# Altium PCB PCB_New-Project_2026-10-14.pcbdoc
Units mil, origin at the board's own origin, x right, y up, seen from the top; angles counter-clockwise.
Board outline 3038.68 x 3315.27 mil, 2 copper layers (Top Layer, Bottom Layer); 55 components, 36 nets, 173 pads, 105 vias.
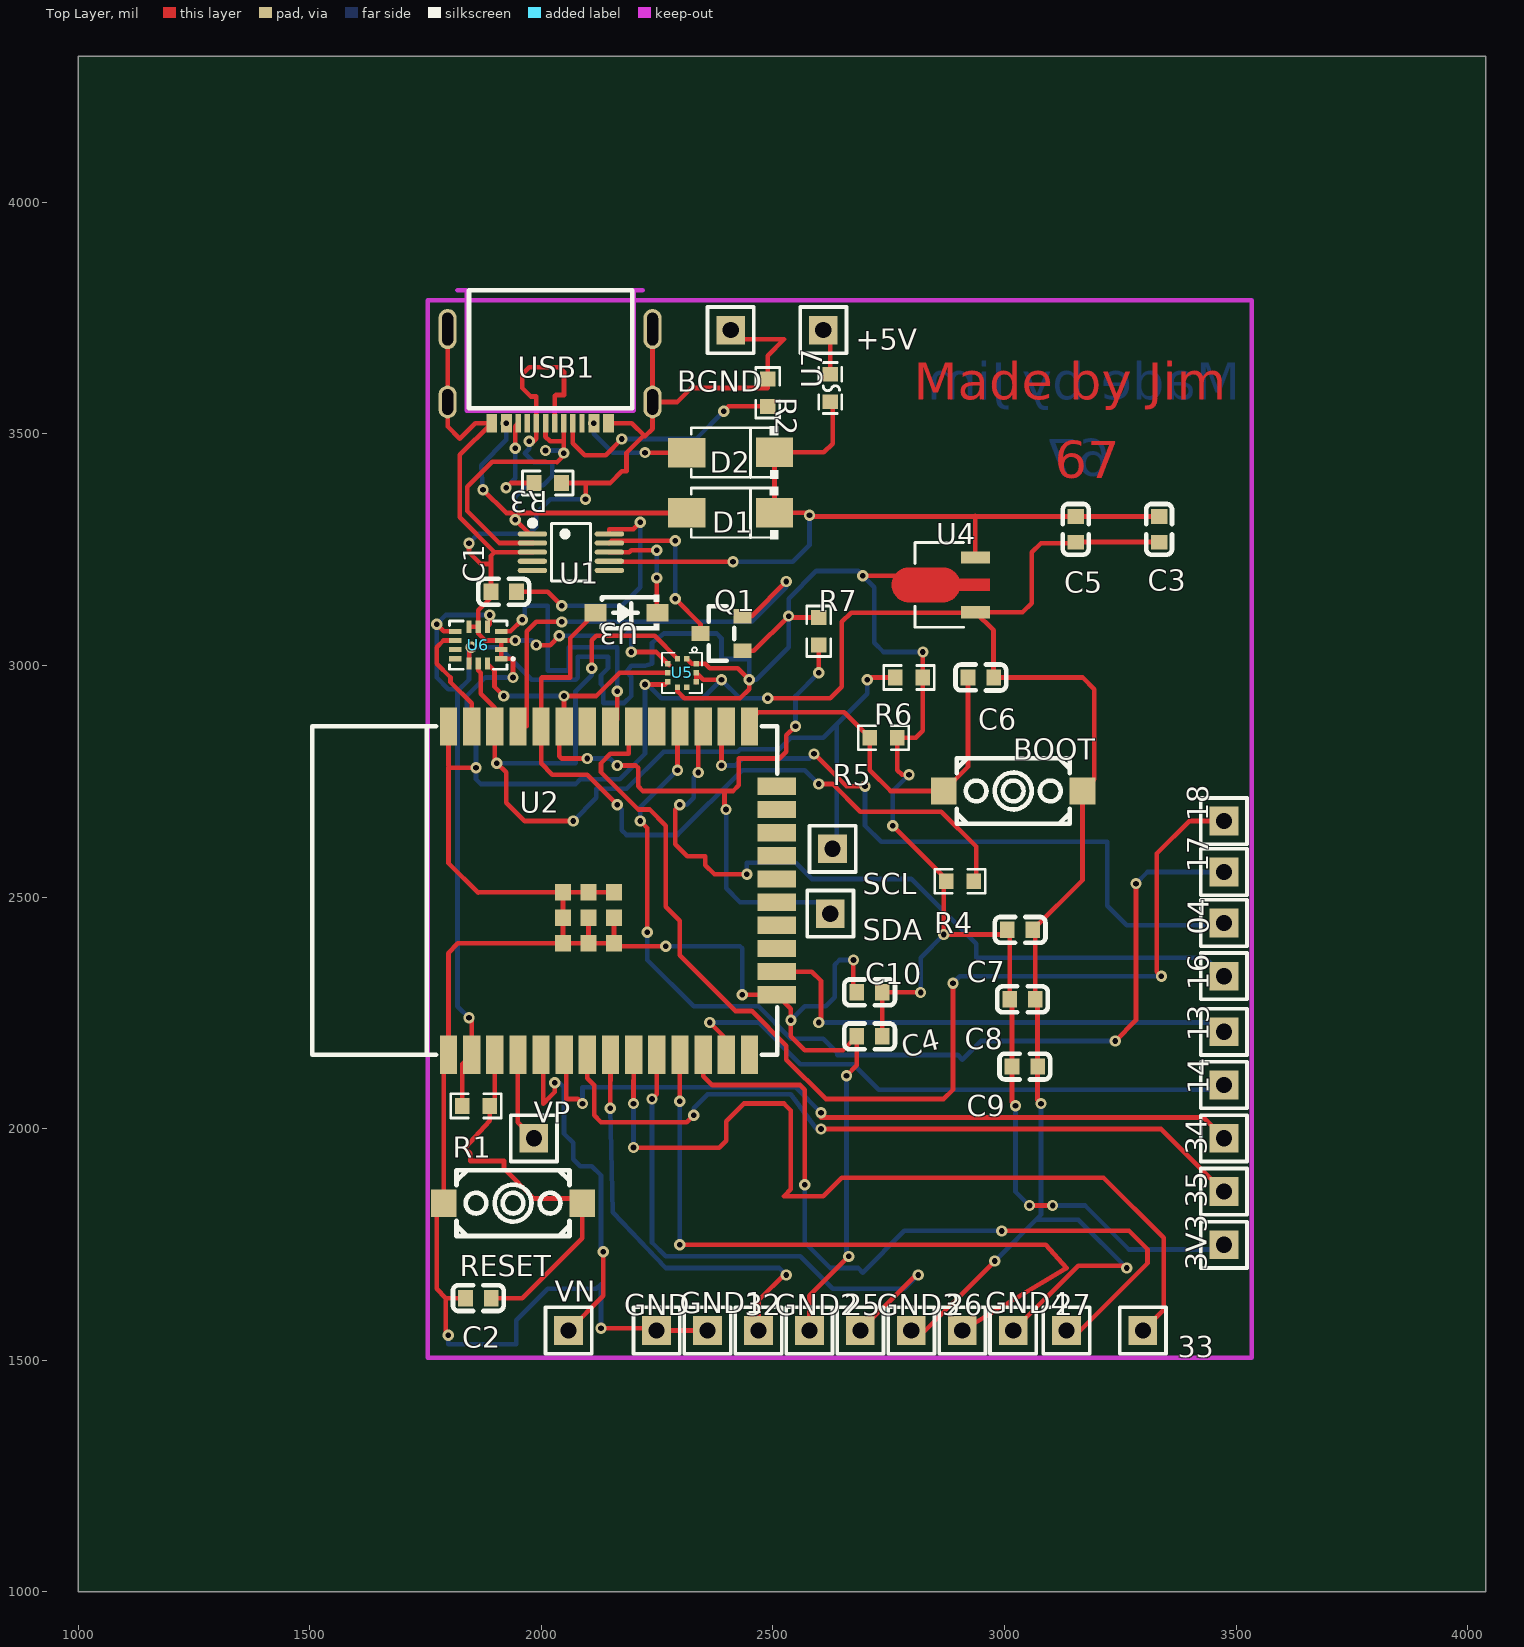
[diagram p0: Top Layer view]
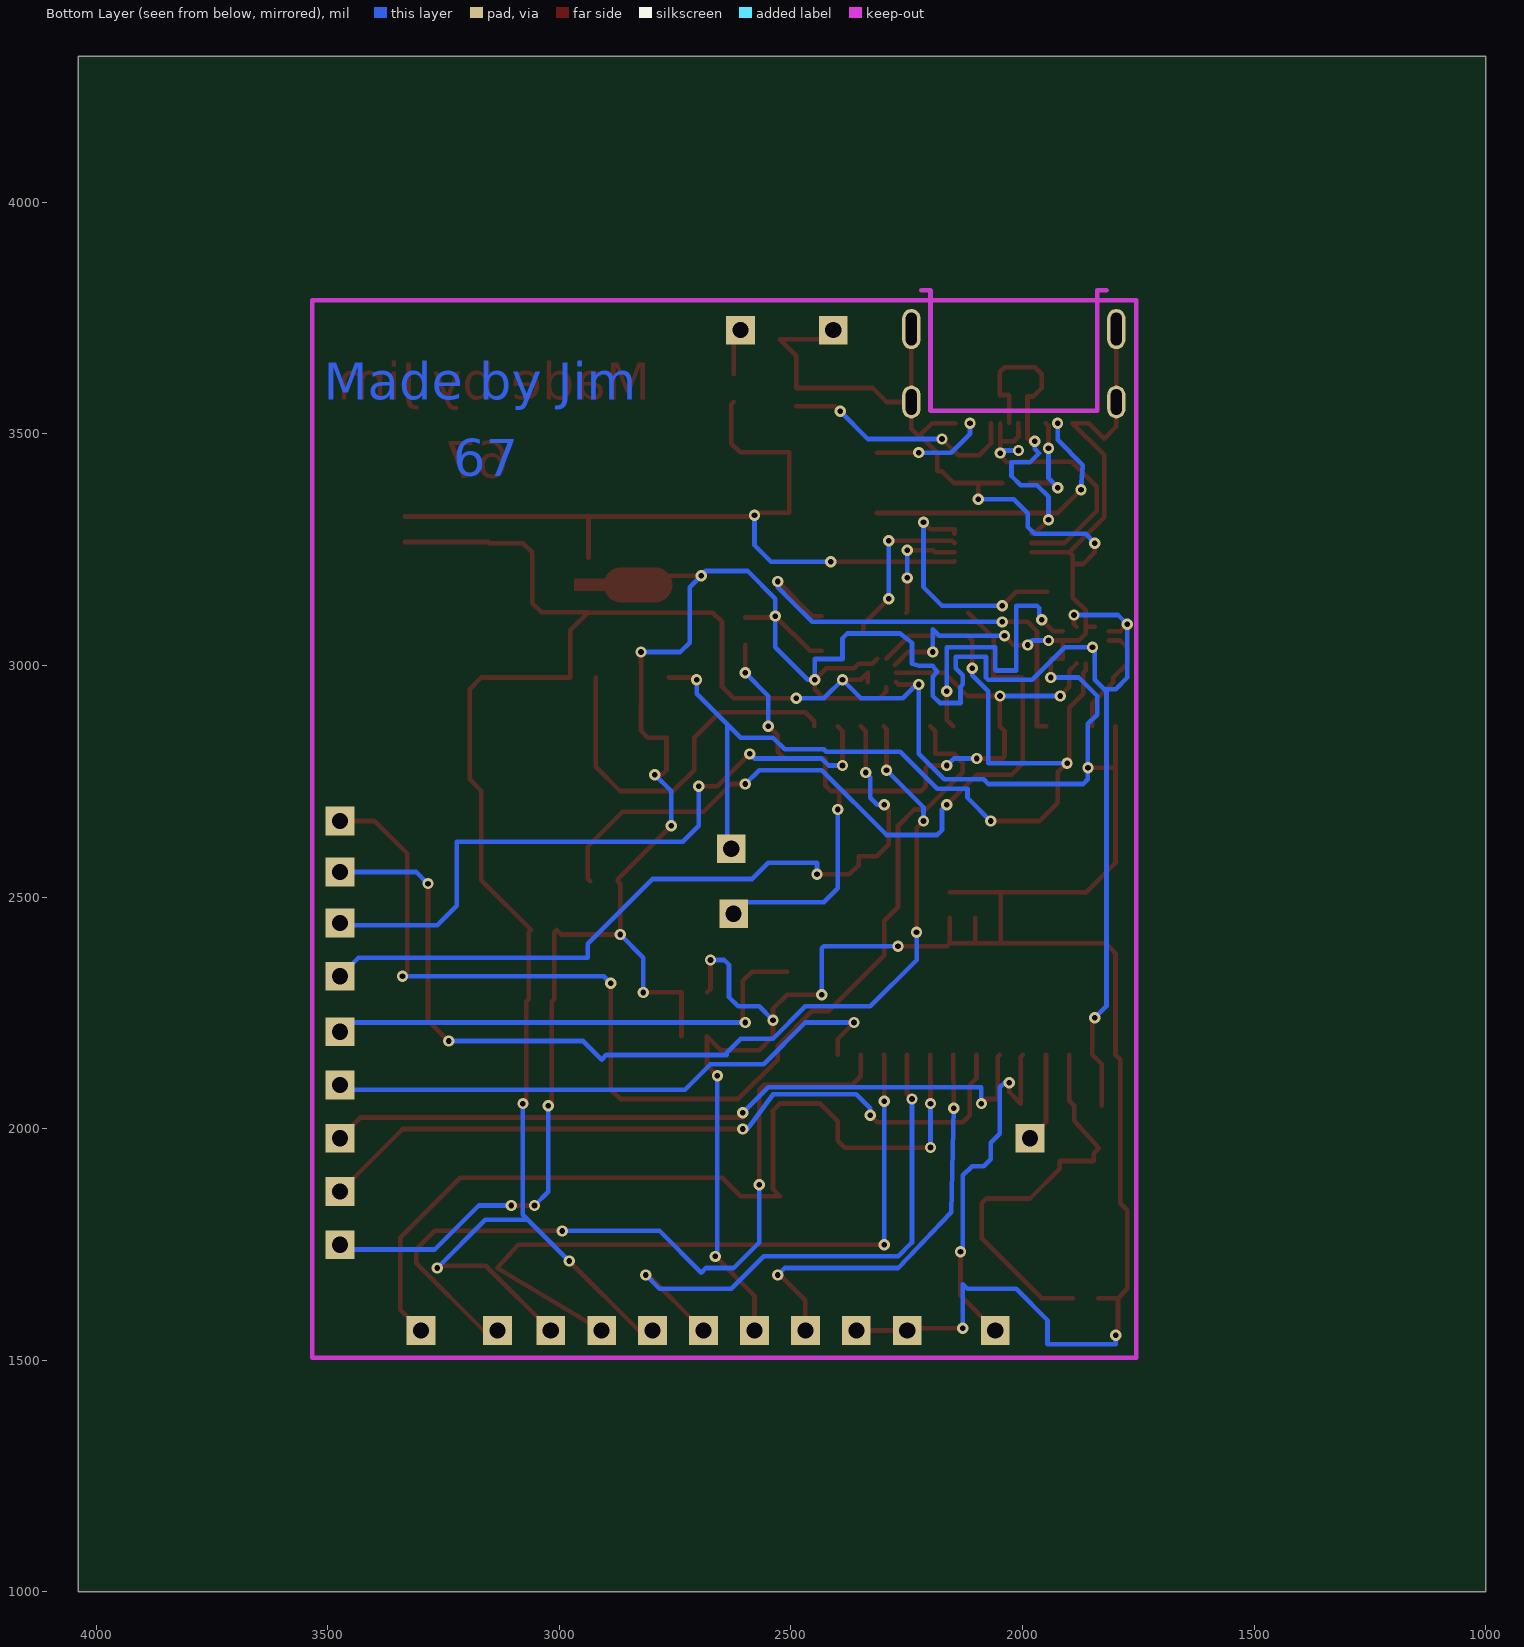
[diagram p1: Bottom Layer view, seen from below]

## Layer stack, top to bottom
Top Layer: signal copper (thickness not stored)
Dielectric: dielectric 12.6, FR-4, Dk 4.8
Bottom Layer: signal copper (thickness not stored)

## Board outline
4038.68,1000 1000,1000 1000,4315.27 4038.68,4315.27

## Components (designator, comment, footprint, x,y, rotation, side; value= is the part's Value field where it differs from the comment)
3V3 "1" HDR-M-2.54_1X1 3473.68,1748.97 r90 top
04 "1" HDR-M-2.54_1X1 3473.68,2443.97 r90 top
13 "1" HDR-M-2.54_1X1 3473.68,2208.97 r90 top
14 "1" HDR-M-2.54_1X1 3473.68,2093.97 r90 top
16 "1" HDR-M-2.54_1X1 3473.68,2328.97 r90 top
17 "1" HDR-M-2.54_1X1 3473.68,2553.97 r90 top
18 "1" HDR-M-2.54_1X1 3473.68,2663.97 r90 top
25 "1" HDR-M-2.54_1X1 2688.68,1563.97 r0 top
26 "1" HDR-M-2.54_1X1 2908.68,1563.97 r0 top
27 "1" HDR-M-2.54_1X1 3133.68,1563.97 r0 top
32 "1" HDR-M-2.54_1X1 2468.68,1563.97 r0 top
33 "1" HDR-M-2.54_1X1 3298.68,1563.97 r0 top
34 "1" HDR-M-2.54_1X1 3473.68,1978.97 r90 top
35 "1" HDR-M-2.54_1X1 3473.68,1863.97 r90 top
+5V "1" HDR-M-2.54_1X1 2608.68,3723.97 r0 top
BGND "1" HDR-M-2.54_1X1 2408.68,3723.97 r0 top
BOOT "K2-3.6×6.1_SMD" KEY-SMD_2P-L6.2-W3.6-LS8.0 3018.68,2728.97 r0 top
C1 "1.0u" C0603 1918.68,3158.97 r0 top
C2 "1.0u" C0603 1863.68,1633.97 r0 top
C3 "0.1u" C0603 3333.68,3293.97 r270 top
C4 "22u" C0603 2708.68,2198.97 r0 top
C5 "10.0u" C0603 3153.68,3293.97 r270 top
C6 "0.1u" C0603 2948.68,2973.97 r180 top
C7 "0.1u" C0603 3033.68,2428.97 r180 top
C8 "0.1u" C0603 3038.68,2278.97 r180 top
C9 "0.1u" C0603 3043.68,2133.97 r180 top
C10 "0.1u" C0603 2708.68,2293.97 r0 top
D1 "SS14_C55127344" SMA_L4.3-W2.6-LS5.0-RD 2408.68,3329.6 r180 top
D2 "SS14_C55127344" SMA_L4.3-W2.6-LS5.0-RD 2408.68,3459.6 r180 top
GND "1" HDR-M-2.54_1X1 2248.68,1563.97 r0 top
GND1 "1" HDR-M-2.54_1X1 2358.68,1563.97 r0 top
GND2 "1" HDR-M-2.54_1X1 2578.68,1563.97 r0 top
GND3 "1" HDR-M-2.54_1X1 2798.68,1563.97 r0 top
GND4 "1" HDR-M-2.54_1X1 3018.68,1563.97 r0 top
Q1 "2N7002" SOT-23_L2.9-W1.3-P0.95-LS2.4-BR 2388.68,3068.97 r0 top
R1 "10k" R0603 1858.68,2048.97 r0 top
R2 "5.1k" R0603 2488.68,3588.97 r270 top
R3 "5.1k" R0603 2013.68,3393.97 r180 top
R4 "4.7k" R0603 2903.68,2533.97 r0 top
R5 "4.7k" R0603 2738.68,2843.97 r180 top
R6 "4.7k" R0603 2793.68,2973.97 r180 top
R7 "4.7k" R0603 2598.68,3073.97 r90 top
RESET "K2-3.6×6.1_SMD" KEY-SMD_2P-L6.2-W3.6-LS8.0 1938.68,1838.97 r0 top
SCL "1" HDR-M-2.54_1X1 2628.68,2603.97 r0 top
SDA "1" HDR-M-2.54_1X1 2623.68,2463.97 r0 top
U1 "CH340E" MSOP-10_L3.0-W3.0-P0.50-LS5.0-BL 2063.68,3244.6 r270 top
U2 "ESP32-WROOM-32E-H4" WIFI-SMD_ESP32-WROOM-32E 2153.68,2513.97 r0 top
U3 "B0520W" SOD-123_L2.7-W1.6-LS3.7-RD-1 2183.68,3113.97 r180 top
U4 "AMS1117-3.3" SOT-89-3_L4.5-W2.5-P1.50-LS4.2-BR 2883.68,3173.97 r0 top
U5 "BMP388(TOKMAS)" LGA-10_L2.0-W2.0-P0.50-BL 2303.68,2983.97 r180 top
U6 "LSM6DS3TR-C" LGA-14_L3.0-W2.5-P0.50-TL 1863.68,3043.97 r180 top
U7 "0603L075/12AR" F0603 2623.68,3598.97 r90 top
USB1 "USBC1-AF-046" USB-C-SMD_USBC1-AF-046 2018.68,3624.6 r180 top
VN "1" HDR-M-2.54_1X1 2058.68,1563.97 r270 top
VP "1" HDR-M-2.54_1X1 1983.68,1978.97 r0 top

## Footprints (in the part's own frame and the unit in brackets; to place one, negate y for a bottom-side part, rotate by r counter-clockwise, add the part's x,y. Pads: shape width x height; smd on the part's side, far side on the other; paste and mask are expansions set on the pad)
C0603 [mm]
  rect 0.8x0.9 smd paste+0 mask+0.051: 1(-0.7,0) 2(0.7,0)
  silkscreen extent -1.39,-0.71 1.39,0.71
F0603 [mil]
  rect 31.75x34.02 smd paste-3937.01 mask+2: 1(-29.65,0) 2(29.66,0)
  silkscreen extent -55,-25 55,25
HDR-M-2.54_1X1 [mil]
  rect 62x62 hole 35 paste+0 mask+2: 1(0,0)
  silkscreen extent -50,-50 50,50
KEY-SMD_2P-L6.2-W3.6-LS8.0 [mm]
  rect 1.4x1.5 smd paste+0 mask+0.051: 1(-3.8,0) 2(3.8,0)
  silkscreen extent -3.1,-1.8 3.1,1.8
LGA-10_L2.0-W2.0-P0.50-BL [mm]
  rect 0.3x0.3 smd paste+0 mask+0.05: 1(-0.25,-0.78) 2(0.25,-0.78) 3(0.78,-0.5) 4(0.78,0) 5(0.78,0.5) 6(0.25,0.78) 7(-0.25,0.78) 8(-0.78,0.5) 9(-0.78,0) 10(-0.78,-0.5)
  silkscreen extent -1.1,-1.4 1.1,1.1
LGA-14_L3.0-W2.5-P0.50-TL [mm]
  rect 0.675x0.28 smd paste+0 mask+0.051: 1(-1.262,0.75) 2(-1.262,0.25) 3(-1.262,-0.25) 4(-1.262,-0.75) 8(1.262,-0.75) 9(1.262,-0.25) 10(1.262,0.25) 11(1.262,0.75)
  rect 0.28x0.675 smd paste+0 mask+0.051: 5(-0.5,-1.012) 6(0,-1.012) 7(0.5,-1.012) 12(0.5,1.012) 13(0,1.012) 14(-0.5,1.012)
  silkscreen extent -1.98,-1.33 1.58,1.33
MSOP-10_L3.0-W3.0-P0.50-LS5.0-BL [mm]
  oval 0.28x1.62 smd paste+0 mask+0.051: 1(-1,-2.11) 2(-0.5,-2.11) 3(0,-2.11) 4(0.5,-2.11) 5(1,-2.11) 6(1,2.11) 7(0.5,2.11) 8(0,2.11) 9(-0.5,2.11) 10(-1,2.11)
  silkscreen extent -1.74,-2.26 1.58,1.07
R0603 [mil]
  rect 31.75x34.02 smd paste-3937.01 mask+2: 1(-29.65,0) 2(29.65,0)
  silkscreen extent -55,-26 55,26
SMA_L4.3-W2.6-LS5.0-RD [mm]
  rect 2.046x1.62 smd paste+0 mask+0.051: 1(-2.404,-0.009) 2(2.404,0.009)
  silkscreen extent -2.61,-1.44 2.16,1.44
SOD-123_L2.7-W1.6-LS3.7-RD-1 [mm]
  rect 1.2x0.95 smd paste+0 mask+0.051: 1(-1.7,0) 2(1.7,0)
  silkscreen extent -1.81,-0.98 1.35,0.98
SOT-23_L2.9-W1.3-P0.95-LS2.4-BR [mm]
  rect 1x0.8 smd paste+0 mask+0.051: 1(1.15,-0.95) 2(1.15,0.95) 3(-1.15,0)
  silkscreen extent -0.7,-1.5 0.7,1.5
SOT-89-3_L4.5-W2.5-P1.50-LS4.2-BR [mm]
  rect 1.575x0.672 smd paste+0 mask+0.051: 1(1.356,-1.5) 3(1.356,1.5)
  Top Layer region: -2.283,0.95 -0.429,0.95 -0.384,0.949 -0.34,0.946 -0.296,0.94 -0.252,0.933 -0.208,0.924 -0.165,0.912 -0.123,0.899 -0.081,0.884 -0.04,0.866 0,0.847 0.04,0.826 0.078,0.803 0.115,0.779 0.151,0.752 0.185,0.724 0.219,0.695 0.251,0.664 0.281,0.631 0.31,0.597 0.337,0.562 0.362,0.525 0.386,0.488 0.408,0.449 0.428,0.409 0.447,0.33 2.144,0.33 2.144,-0.33 0.447,-0.33 0.428,-0.409 0.408,-0.449 0.386,-0.488 0.362,-0.526 0.337,-0.562 0.31,-0.597 0.281,-0.631 0.251,-0.664 0.219,-0.695 0.185,-0.725 0.151,-0.753 0.115,-0.779 0.078,-0.804 0.04,-0.827 0,-0.848 -0.04,-0.867 -0.081,-0.884 -0.123,-0.899 -0.165,-0.913 -0.208,-0.924 -0.252,-0.934 -0.296,-0.941 -0.34,-0.946 -0.384,-0.949 -0.429,-0.95 -2.283,-0.95 -2.328,-0.949 -2.372,-0.946 -2.416,-0.941 -2.46,-0.934 -2.504,-0.924 -2.547,-0.913 -2.589,-0.899 -2.631,-0.884 -2.672,-0.867 -2.713,-0.848 -2.752,-0.827 -2.79,-0.804 -2.827,-0.779 -2.863,-0.753 -2.898,-0.725 -2.931,-0.695 -2.963,-0.664 -2.993,-0.631 -3.022,-0.597 -3.049,-0.562 -3.075,-0.526 -3.098,-0.488 -3.12,-0.449 -3.141,-0.409 -3.159,-0.369 -3.175,-0.327 -3.189,-0.285 -3.202,-0.242 -3.212,-0.199 -3.22,-0.155 -3.227,-0.111 -3.231,-0.067 -3.233,-0.022 -3.233,0.022 -3.231,0.067 -3.227,0.111 -3.22,0.155 -3.212,0.199 -3.202,0.242 -3.189,0.285 -3.175,0.327 -3.159,0.369 -3.141,0.409 -3.12,0.449 -3.098,0.488 -3.075,0.525 -3.049,0.562 -3.022,0.597 -2.993,0.631 -2.963,0.664 -2.931,0.695 -2.898,0.724 -2.863,0.752 -2.827,0.779 -2.79,0.803 -2.752,0.826 -2.713,0.847 -2.672,0.866 -2.631,0.884 -2.589,0.899 -2.547,0.912 -2.504,0.924 -2.46,0.933 -2.416,0.94 -2.372,0.946 -2.328,0.949
  silkscreen extent -1.95,-2.33 0.7,2.33
USB-C-SMD_USBC1-AF-046 [mm]
  rect 0.6x1 smd paste-100 mask+0.05: A1B12(-3.2,2.583) A4B9(-2.4,2.583) B1A12(3.2,2.583) B4A9(2.4,2.583)
  rect 0.3x1 smd paste-100 mask+0.05: A5(-1.25,2.583) A6(-0.25,2.583) A7(0.25,2.583) A8(-1.75,2.583) B5(1.75,2.583) B6(0.75,2.583) B7(-0.75,2.583) B8(1.25,2.583)
  oval 1x2.2 hole 0.6 slot 1.8 at 90 deg paste+0 mask+0.05: EP(-5.62,-2.583) EP(5.62,-2.583)
  oval 1x1.8 hole 0.6 slot 1.4 at 90 deg paste+0 mask+0.05: EP(-5.62,1.417) EP(5.62,1.417)
  Keep-Out Layer lines w0.254: 5.08,-4.716 4.572,-4.716 4.572,1.888 -4.572,1.888 -4.572,-4.716 -5.08,-4.716
  silkscreen extent -4.5,-4.71 4.44,1.76
WIFI-SMD_ESP32-WROOM-32E [mm]
  rect 0.95x2.1 smd paste+0 mask+0.051: 1(-9.002,-9) 2(-7.732,-9) 3(-6.462,-9) 4(-5.192,-9) 5(-3.922,-9) 6(-2.652,-9) 7(-1.382,-9) 8(-0.112,-9) 9(1.158,-9) 10(2.428,-9) 11(3.698,-9) 12(4.968,-9) 13(6.238,-9) 14(7.508,-9) 25(7.507,9) 26(6.237,9) 27(4.967,9) 28(3.697,9) 29(2.427,9) 30(1.157,9) 31(-0.113,9) 32(-1.383,9) 33(-2.653,9) 34(-3.923,9) 35(-5.193,9) 36(-6.463,9) 37(-7.733,9) 38(-9.003,9)
  rect 2.1x0.95 smd paste+0 mask+0.051: 15(9.002,-5.715) 16(9.002,-4.445) 17(9.002,-3.175) 18(9.002,-1.905) 19(9.002,-0.635) 20(9.002,0.635) 21(9.002,1.905) 22(9.002,3.175) 23(9.002,4.445) 24(9.002,5.715)
  rect 0.9x0.9 smd paste+0 mask+0.051: 39(-2.721,-2.9) 39(-2.721,-1.5) 39(-2.721,-0.1) 39(-1.322,-2.9) 39(-1.322,-0.1) 39(-1.321,-1.5) 39(0.079,-2.9) 39(0.079,-1.5) 39(0.079,-0.1)
  silkscreen extent -16.48,-9 9.02,9.02

## Via types
v1: diameter 24.41, hole 12.2, Top Layer to Bottom Layer, tented both sides, 105 vias

## Nets (pads, with @x,y where several pads share a name; then routed paths per layer and width w, separated by ;. In a path a pad name is that pad's centre, name@x,y a point inside that pad or via, vN(x,y) a via of type N, cw(c..) or ccw(c..) an arc to the next point about the centre after c; other vN are vias at no path point)
+3.3V: 3V3.1 C4.2 C7.2 C8.2 C9.2 C10.2 Q1.1 R1.1 R4.1 R5.1 R6.1 R7.2 U2.2 U5.1 U5.6 U5.10 U6.5 U6.8 U6.12 | length 6107.9
  Top Layer w10: v1(1773.68,3088.97) 1789.15,3073.5 U6.8 ; R1.1 1829.02,2139.41 U2.2 1849.25,2233.4 v1(1843.68,2238.97) ; U6.12 1843.99,3034.28 v1(1848.68,3038.97) ; U6.5 1888.68,3089.15 v1(1888.68,3108.97) ; U5.6 2293.84,2943.81 2308.68,2928.97 2428.68,2928.97 2448.68,2948.97 v1(2448.68,2968.97) 2423.68,2993.97 2363.68,2993.97 2353.99,3003.66 U5.10 2324.54,3003.66 U5.1 ; Q1.1 2458.68,3031.57 v1(2533.68,3106.57) 2536.62,3103.63 R7.2 ; v1(2693.68,3193.97) 2810.29,3193.97 2830.29,3173.97 ; C4.2 C10.2 v1(2818.68,2293.97) ; v1(2758.68,2653.97) 2874.03,2538.62 R4.1 2868.68,2528.62 v1(2868.68,2418.97) 2996.12,2418.97 C7.2 3011.12,2423.97 C8.2 3016.12,2273.97 C9.2 3016.12,2056.53 v1(3023.68,2048.97) ; R5.1 2768.68,2843.62 2768.68,2773.97 2778.68,2763.97 v1(2793.68,2763.97) ; R5.1@2768.38,2844 2808.68,2844 2823.68,2859 2823.38,2974 v1(2823.68,3028.97) ; v1(3053.68,1833.97) v1(3103.68,1833.97)
  Bottom Layer w10: 1823.62,2948.91 1798.74,2948.91 1773.68,2973.97 v1(1773.68,3088.97) 1793.68,3108.97 v1(1888.68,3108.97) ; v1(1843.68,2238.97) 1818.68,2264 1818.68,2944 1843.68,2969 1843.68,3033.97 v1(1848.68,3038.97) ; v1(1848.68,3038.97) 1908.68,3039 1978.68,2969 2074.48,2969 2078.68,2973.2 2078.68,3019 2143.68,3019 2143.68,2994 2128.68,2979 2128.68,2959 2133.68,2954 2133.68,2919 2178.68,2919 2193.68,2934 2193.68,2976 2183.68,2986 2193.68,2999 2213.68,2999 2223.68,2998.97 2238.68,3004 2238.68,3049 2264.28,3069 2378.68,3069 2388.68,3059 2388.68,3014 2448.68,3014 v1(2448.68,2968.97) ; v1(2448.68,2968.97) 2463.68,2968.97 2533.68,3038.97 v1(2533.68,3106.57) ; v1(2533.68,3106.57) 2533.68,3144 2593.68,3204 2683.68,3204 v1(2693.68,3193.97) ; v1(2693.68,3193.97) 2718.68,3168.97 2718.68,3048.97 2738.68,3028.97 v1(2823.68,3028.97) ; v1(2758.68,2653.97) 2758.68,2728.97 v1(2793.68,2763.97) ; v1(2818.68,2293.97) 2818.68,2368.97 v1(2868.68,2418.97) ; v1(3023.68,2048.97) 3023.68,1863.97 v1(3053.68,1833.97) ; v1(3103.68,1833.97) 3173.68,1833.97 3268.68,1738.97 3463.68,1738.97 3V3.1
+5V_1: +5V.1 U7.2 | length 101.6
  Top Layer w10: +5V.1 2623.68,3708.97 U7.2
GND: BGND.1 BOOT.2 C1.1 C2.1 C3.2 C4.1 C5.2 C6.1 C7.1 C8.1 C9.1 C10.1 GND1.1 GND2.1 GND3.1 GND4.1 GND.1 R2.1 R3.1 RESET.1 U1.3 U2.1 U2.15 U2.38 U2.39 U4.1 U5.3 U5.5 U5.8 U5.9 U6.1 U6.2 U6.3 U6.6 U6.7 USB1.A1B12 USB1.B1A12 USB1.EP | length 12724.6
  Top Layer w10: 1793.68,1634 1793.68,1558.97 v1(1798.68,1553.97) ; USB1.EP@1797.42,3726.28 1797.42,3568.8 1797.42,3515.86 1823.68,3489.6 1856.99,3522.91 USB1.B1A12 1823.68,3454.6 1823.68,3319.6 1898.68,3244.6 ; U2.1 1789.08,2149.47 RESET.1 1773.68,1823.57 1773.68,1653.96 1793.66,1634 C2.1 ; 1799.25,2783.09 U2.38@1799.25,2868.3 ; U2.1 1799.28,2378.4 1819.48,2399.8 U2.39@2046.48,2399.8 ; v1(1843.68,3263.97) 1843.68,3243.97 1868.68,3218.97 1891.12,3218.97 ; U6.7 U6.6 ; v1(1858.68,2778.97) 1799.25,2778.97 1799.25,2573.4 1863.68,2508.97 1864.75,2510.03 U2.39@2046.53,2510.03 ; v1(1938.68,2973.97) 1938.68,3014.44 U6.1 U6.2 U6.3 ; v1(1943.68,3053.97) 1913.53,3053.97 U6.3 ; U1.3 1898.68,3244.6 ; v1(1988.68,3043.97) 2018.68,3043.97 v1(2038.68,3063.97) ; R3.1 2148.68,3393.97 2173.68,3418.97 2183.68,3418.97 2183.68,3458.97 2219.31,3494.6 2223.68,3494.6 ; v1(2095.32,3358.97) 2095.33,3393.97 ; U2.39@2101.65,2454.91 U2.39@2101.65,2399.8 ; v1(2128.68,1568.97) 2243.68,1568.97 GND.1 GND1.1 ; USB1.A1B12 2195.38,3522.91 2223.68,3494.6 ; U2.39@2156.77,2454.91 U2.39@2156.77,2399.8 ; U2.39@2156.77,2510.03 2101.65,2510.03 U2.39@2046.53,2510.03 ; v1(2193.68,3028.97) 2247.66,3028.97 U5.3 ; v1(2223.68,2958.97) 2267.65,2958.97 U5.5 ; USB1.EP@2239.94,3726.3 2239.94,3568.8 2239.94,3510.86 2223.68,3494.6 ; USB1.EP@2239.98,3568.8 2293.48,3568.8 2323.68,3599 2488.68,3599 R2.1 ; v1(2268.68,2393.97) 2162.6,2393.97 U2.39@2156.77,2399.8 ; U5.3 U5.3@2275.68,3001 ; U5.8 U5.9 2349.39,2968.97 v1(2388.68,2968.97) ; BGND.1 2428.68,3703.97 2523.68,3703.97 2488.68,3668.97 R2.1 ; v1(2433.68,2288.97) U2.15 2538.68,2258.4 v1(2538.68,2233.97) 2538.68,2198.97 2568.68,2168.97 2651.12,2168.97 C4.1 2681.12,2136.41 v1(2658.68,2113.97) ; v1(2488.68,2928.97) 2623.68,2928.97 2648.68,2953.97 2648.68,3093.97 2668.68,3113.97 2936.14,3113.97 U4.1 ; GND2.1 2578.68,1638.97 v1(2663.68,1723.97) ; v1(2673.68,2363.97) 2673.68,2301.41 C10.1 ; GND3.1 2828.68,1563.97 v1(2978.68,1713.97) ; GND4.1 3158.71,1704 v1@3263.68,1704 ; v1(3078.68,2053.97) 3071.24,2061.41 C9.1 3071.24,2273.97 C8.1 3066.24,2423.97 C7.1 3168.29,2536.01 BOOT.2 3193.68,2754.36 3193.68,2948.97 3168.68,2973.97 C6.1 2976.24,3075.75 U4.1 ; C3.2 C5.2 3151.28,3264 3078.68,3264 3058.68,3244 3058.68,3134 3038.68,3114.9 U4.1 ; U6.6 1863.68,3118.97 1891.12,3146.41 C1.1 1891.12,3237.04 1898.68,3244.6 ; U6.6 1863.68,3068.97 1878.84,3053.81 U6.3 ; U2.39@2046.53,2510.03 2046.53,2454.91 2046.53,2399.8 U2.39@2101.65,2399.8 ; U2.39@2101.65,2399.8 U2.39@2156.77,2399.8
  Bottom Layer w10: v1(1798.68,1553.97) 1798.68,1534 1945.98,1534 1945.98,1586.3 2013.68,1654 2118.68,1654 2128.68,1664 v1(2128.68,1568.97) ; v1(1843.68,3263.97) 1863.68,3283.97 1893.68,3283.97 1973.68,3283.97 1988.68,3298.97 1988.68,3328.97 2018.68,3358.97 v1(2095.32,3358.97) ; v1(1938.68,2973.97) 1878.68,2973.97 1838.68,2933.97 1838.68,2893.97 1858.68,2873.97 v1(1858.68,2778.97) 1858.68,2753.97 1868.68,2743.97 2073.68,2743.97 2083.68,2753.97 2168.68,2753.97 2223.68,2808.97 v1(2223.68,2958.97) 2228.68,2958.97 2258.68,2928.97 2348.68,2928.97 v1(2388.68,2968.97) 2428.68,2928.97 v1(2488.68,2928.97) ; v1(1943.68,3053.97) 1978.68,3053.97 v1(1988.68,3043.97) ; v1(2038.68,3063.97) 2179.78,3063.97 2193.68,3077.87 ; v1(2268.68,2393.97) 2428.68,2393.97 2433.68,2388.97 v1(2433.68,2288.97) ; v1(2538.68,2233.97) 2568.68,2263.97 2613.68,2263.97 2633.68,2283.97 2633.68,2353.97 2643.68,2363.97 v1(2673.68,2363.97) ; v1(2658.68,2113.97) 2658.68,1728.97 v1(2663.68,1723.97) ; v1(2978.68,1713.97) 3078.68,1813.97 v1(3078.68,2053.97) ; 3067.84,1803.12 3159.53,1803.12 v1(3263.68,1698.97) ; 2193.68,3077.87 v1(2193.68,3028.97) 2193.68,3077.87
U1_8: U1.8 U3.1 | length 239.5
  Top Layer w10: U1.8 2189.31,3244.6 2193.68,3248.97 v1(2248.68,3248.97) ; v1(2248.68,3188.97) 2248.68,3115.9 U3.1
  Bottom Layer w10: v1(2248.68,3188.97) v1(2248.68,3248.97)
U1_9: Q1.3 U1.9 | length 366.5
  Top Layer w10: U1.9 2151.44,3268.97 v1(2288.68,3268.97) ; v1(2288.68,3143.97) 2343.41,3089.24 Q1.3
  Bottom Layer w10: v1(2288.68,3143.97) v1(2288.68,3268.97)
U1_10: C1.2 U1.10 | length 519.5
  Top Layer w10: C1.2 2013.68,3158.97 v1(2043.68,3128.97) ; U1.10 2146.78,3294 2198.68,3294 v1(2213.68,3308.97)
  Bottom Layer w10: v1(2043.68,3128.97) 2173.68,3128.97 2213.68,3168.97 v1(2213.68,3308.97)
U2_3: C2.2 R1.2 RESET.2 U2.3 | length 875.1
  Top Layer w10: R1.2 1899.25,2059.88 U2.3 ; R1.2@1888.38,2049 1888.38,2016.6 1834.98,1957.89 1846.4,1946.47 1846.4,1929.9 1919.32,1929.9 1919.32,1913.33 1983.68,1848.97 2078.29,1848.97 RESET.2 ; C2.2 1958.83,1633.97 2088.29,1763.44 RESET.2
U2_4: U2.4 VP.1 | length 194.9
  Top Layer w10: U2.4 1949.25,2013.4 VP.1
U2_5: U2.5 VN.1 | length 792.9
  Top Layer w10: U2.5 2003.68,2155.21 2003.68,2053.97 2028.68,2078.97 v1(2028.68,2098.97) ; VN.1 2133.68,1638.97 v1(2133.68,1733.97)
  Bottom Layer w10: v1(2028.68,2098.97) 2038.68,2099 2048.68,2089 2048.68,1989 2068.68,1969 2068.68,1934 2083.68,1919 2108.68,1919 2128.68,1899 2128.68,1739 v1(2133.68,1733.97)
U2_6: 34.1 U2.6 | length 2145.9
  Top Layer w10: U2.6 2053.68,2155.21 2053.68,2063.97 2078.68,2063.97 v1(2088.68,2053.97) ; v1(2603.68,2033.97) 2603.68,2024 3428.68,2024 34.1
  Bottom Layer w10: v1(2088.68,2053.97) 2088.68,2088.97 ; 2088.68,2088.97 2548.68,2088.97 ; 2088.68,2088.97 2548.68,2088.97 ; 2548.68,2088.97 v1(2603.68,2033.97) 2548.68,2088.97
U2_7: 35.1 U2.7 | length 1630.4
  Top Layer w10: U2.7 2099.25,2108.4 2113.68,2093.97 2113.68,2028.97 2128.68,2013.97 2313.68,2013.97 v1(2328.68,2028.97) ; v1(2603.68,1998.97) 3338.68,1998.97 35.1
  Bottom Layer w10: v1(2328.68,2028.97) 2328.68,2043.97 2358.68,2073.97 2538.68,2073.97 2593.68,1999 v1(2603.68,1998.97)
U2_8: 32.1 U2.8 | length 922.9
  Top Layer w10: v1(2148.68,2043.97) U2.8 ; 32.1 2468.68,1628.97 v1@2528.68,1688.97
  Bottom Layer w10: v1(2148.68,2043.97) 2153.68,1818.97 2268.68,1699 2513.68,1699 v1(2528.68,1683.97)
U2_9: 33.1 U2.9 | length 3414.9
  Top Layer w10: v1(2198.68,1958.97) 2383.65,1958.97 2398.68,1974 ; v1(2198.68,2053.97) U2.9 ; 2398.68,1974 2398.68,2015.7 ; 2398.68,1974 2398.68,2015.7 ; 2398.68,2015.7 2436.98,2054 ; 2398.68,2015.7 2436.98,2054 ; 2436.98,2054 2523.68,2054 ; 2436.98,2054 2523.68,2054 ; 2523.68,1854 2608.68,1854 ; 2523.68,1854 2538.68,1869 ; 2523.68,1854 2608.68,1854 ; 2523.68,1854 2538.68,1869 ; 2523.68,2054 2538.68,2039 ; 2523.68,2054 2538.68,2039 ; 2538.68,1869 2538.68,2039 ; 2538.68,1869 2538.68,2039 ; 2608.68,1854 2648.68,1894 ; 2608.68,1854 2648.68,1894 ; 2648.68,1894 3213.68,1894 ; 2648.68,1894 3213.68,1894 ; 3213.68,1894 3343.68,1764 ; 3213.68,1894 3343.68,1764 ; 3343.68,1609 33.1 3343.68,1609 ; 3343.68,1609 3343.68,1764 ; 3343.68,1609 3343.68,1764
  Bottom Layer w10: v1(2198.68,1958.97) v1(2198.68,2053.97)
U2_10: 25.1 U2.10 | length 1215.7
  Top Layer w10: v1(2238.68,2063.97) 2249.25,2074.54 U2.10 ; 25.1 v1@2813.68,1688.97
  Bottom Layer w10: v1(2238.68,2063.97) 2238.68,1753.97 2268.68,1723.97 2558.68,1723.97 2628.68,1653.97 2783.68,1653.97 v1(2813.68,1683.97)
U2_11: 26.1 U2.11 | length 1530.6
  Top Layer w10: v1(2298.68,1748.97) 3088.68,1748.97 3133.68,1698.97 26.1 ; v1(2298.68,2058.97) 2298.68,2159.07 U2.11
  Bottom Layer w10: v1(2298.68,1748.97) v1(2298.68,2058.97)
U2_12: 27.1 U2.12 | length 1693.7
  Top Layer w10: U2.12 2349.25,2113.4 2368.68,2093.97 2558.68,2093.97 2568.68,2083.97 v1(2568.68,1878.97) ; v1(2993.68,1779) 3268.68,1779 3308.68,1739 3308.68,1709 3163.68,1564 27.1
  Bottom Layer w10: v1(2568.68,1878.97) 2568.68,1823.97 2568.68,1753.97 2623.68,1698.97 2683.68,1698.97 2693.68,1688.97 2783.71,1779 v1(2993.68,1779)
U2_13: 14.1 U2.13 | length 1258.3
  Top Layer w10: v1(2363.68,2228.97) 2399.25,2193.4 U2.13
  Bottom Layer w10: v1(2363.68,2228.97) 2468.68,2228.97 2558.68,2138.97 2673.68,2138.97 2728.68,2083.97 3463.68,2083.97 14.1
U2_16: 13.1 U2.16 | length 1079.2
  Top Layer w10: U2.16 2583.68,2338.97 2603.68,2318.97 2603.68,2233.97 v1(2598.68,2228.97)
  Bottom Layer w10: v1(2598.68,2228.97) 3453.68,2228.97 13.1
U2_25: BOOT.1 C6.2 R5.2 U2.25 | length 817.3
  Top Layer w10: U2.25@2449.25,2868.3 2449.25,2879.54 2468.68,2898.97 2654.02,2898.97 R5.2 ; R5.2 2708.98,2773.6 2753.68,2729 BOOT.1 ; BOOT.1 2921.12,2781.01 C6.2
U2_26: 04.1 U2.26 | length 1546.4
  Top Layer w10: v1(2388.68,2783.97) 2388.68,2857.73 U2.26@2399.25,2868.3 ; v1(2588.68,2808.97) 2658.68,2738.97 v1(2698.68,2738.97)
  Bottom Layer w10: v1(2588.68,2808.97) 2578.68,2798.97 2433.68,2798.97 ; v1(2698.68,2738.97) 2698.68,2654 2733.68,2619 3221.86,2619 3221.86,2480.8 3263.68,2438.97 3468.68,2438.97 04.1 04.1@3448.71,2443.97 ; 2418.68,2783.97 v1(2388.68,2783.97) 2418.68,2783.97 ; 2418.68,2783.97 2433.68,2798.97 ; 2418.68,2783.97 2433.68,2798.97
U2_27: 16.1 U2.27 | length 1714.5
  Top Layer w10: v1(2298.68,2698.97) 2288.68,2688.97 2288.68,2613.97 2314.57,2588.08 2353.68,2588.08 2353.68,2568.97 2373.68,2548.97 v1(2443.68,2548.97) ; v1(2338.68,2768.97) 2338.68,2857.73 U2.27@2349.25,2868.3
  Bottom Layer w10: v1(2298.68,2698.97) 2313.68,2698.97 2328.68,2713.97 ; v1(2443.68,2548.97) 2443.68,2573.97 2548.71,2573.97 2583.68,2539 2798.68,2539 2938.68,2399 2938.68,2369 3433.68,2369 16.1 ; 2328.68,2713.97 2328.68,2758.97 ; 2328.68,2713.97 2328.68,2758.97 ; 2328.68,2758.97 v1(2338.68,2768.97) 2328.68,2758.97
U2_28: 17.1 U2.28 | length 3146.1
  Top Layer w10: v1(2213.68,2663.97) 2228.68,2648.97 v1(2228.68,2423.97) ; v1(2293.68,2773.97) 2293.68,2862.73 U2.28@2299.25,2868.3 ; v1(3238.68,2188.97) 3283.68,2233.97 v1(3283.68,2528.97)
  Bottom Layer w10: v1(2213.68,2663.97) 2213.68,2693.97 v1(2293.68,2773.97) ; 2518.68,2214 2468.68,2264 ; v1(3238.68,2188.97) 2948.68,2188.97 2908.68,2148.97 2898.68,2158.97 2638.68,2158.97 2638.68,2163.97 2608.68,2193.97 ; v1(3283.68,2528.97) 3308.68,2553.97 17.1 ; 2228.68,2364 v1(2228.68,2423.97) ; 2228.68,2364 2328.68,2264 ; 2228.68,2364 v1(2228.68,2423.97) ; 2228.68,2364 2328.68,2264 ; 2228.68,2364 v1(2228.68,2423.97) ; 2228.68,2364 2328.68,2264 ; 2328.68,2264 2468.68,2264 ; 2328.68,2264 2468.68,2264 ; 2328.68,2264 2468.68,2264 ; 2468.68,2264 2538.71,2193.97 ; 2468.68,2264 2538.71,2193.97 ; 2538.71,2193.97 2608.68,2193.97 ; 2538.71,2193.97 2608.68,2193.97
U2_30: 18.1 U2.30 | length 3478.5
  Top Layer w10: v1(2888.68,2313.97) 2888.68,2083.97 2868.68,2063.97 2613.68,2063.97 2528.68,2148.97 ; v1(3338.68,2328.97) 3328.68,2339 3328.68,2594 3398.68,2664 18.1 ; 2128.68,2769 2128.68,2789 ; 2128.68,2769 2208.68,2689 ; 2128.68,2769 2128.68,2789 ; 2128.68,2769 2208.68,2689 ; 2128.68,2789 2148.68,2809 ; 2128.68,2789 2148.68,2809 ; 2148.68,2809 2188.68,2809 ; 2148.68,2809 2188.68,2809 ; 2188.68,2809 U2.30@2188.68,2857.7 ; 2188.68,2809 U2.30@2188.68,2857.7 ; U2.30@2188.68,2857.7 2199.28,2868.3 U2.30@2188.68,2857.7 ; 2208.68,2689 2233.68,2689 ; 2208.68,2689 2233.68,2689 ; 2233.68,2689 2268.68,2654 ; 2233.68,2689 2268.68,2654 ; 2268.68,2478.97 2268.68,2654 ; 2268.68,2478.97 2298.68,2448.97 ; 2268.68,2478.97 2268.68,2654 ; 2268.68,2478.97 2298.68,2448.97 ; 2298.68,2373.97 2298.68,2448.97 ; 2298.68,2373.97 2418.68,2253.97 ; 2298.68,2373.97 2298.68,2448.97 ; 2298.68,2373.97 2418.68,2253.97 ; 2418.68,2253.97 2453.68,2253.97 ; 2418.68,2253.97 2453.68,2253.97 ; 2453.68,2253.97 2528.68,2178.97 ; 2453.68,2253.97 2528.68,2178.97 ; 2528.68,2148.97 2528.68,2178.97 ; 2528.68,2148.97 2528.68,2178.97
  Bottom Layer w10: v1(2888.68,2313.97) 2903.68,2328.97 v1(3338.68,2328.97)
U2_31: U2.31 U6.4 | length 650.4
  Top Layer w10: U6.4 1933.21,3073.5 v1(1958.68,3098.97) ; U2.31@2149.25,2868.3 2163.68,2882.73 v1(2163.68,2943.97)
  Bottom Layer w10: v1(1958.68,3098.97) 1963.68,3104 1963.68,3124 1968.68,3129 2013.68,3129 2013.68,2989 2056.58,2989 2058.68,2991 2058.68,3039 2163.68,3039 v1(2163.68,2943.97)
U2_33: R7.1 SDA.1 U2.33 U5.4 U6.14 | length 1926.1
  Top Layer w10: U6.14 1898.68,2988.79 1898.68,2953.97 v1(1918.68,2933.97) ; v1(2048.68,2933.97) 2118.68,2933.97 2168.68,2983.97 U5.4 ; v1(2048.68,2933.97) 2049.28,2868.3 2038.68,2857.7 2038.68,2804 2043.71,2798.97 v1(2098.68,2798.97) ; v1(2163.68,2783.97) 2203.61,2783.97 2208.68,2778.9 2208.68,2738.97 2218.68,2728.97 2413.68,2728.97 2426.12,2741.41 2426.12,2798.97 2513.68,2798.97 2528.68,2813.97 2528.68,2848.97 v1(2548.68,2868.97) ; 2395.33,2728.97 2395.33,2692.32 v1(2398.68,2688.97) ; v1(2598.68,2983.97) R7.1
  Bottom Layer w10: v1(1918.68,2933.97) v1(2048.68,2933.97) ; v1(2098.68,2798.97) 2148.68,2798.97 v1(2163.68,2783.97) ; v1(2398.68,2688.97) 2398.68,2518.97 2428.68,2488.97 2598.68,2488.97 SDA.1 ; v1(2548.68,2868.97) 2548.68,2933.97 v1(2598.68,2983.97)
U2_34: R4.2 U2.34 U3.2 | length 1644.1
  Top Layer w10: U2.34@1999.25,2868.3 1999.25,2788.4 2023.68,2763.97 2098.68,2763.97 v1(2163.68,2698.97) ; U2.34@1999.28,2868.3 1999.28,2972.6 2000.58,2974 2062.58,2974 2061.98,3059.2 U3.2 ; v1(2598.68,2743.97) 2628.68,2744 2688.68,2684 2863.68,2684 2938.68,2609 2938.68,2539.3 R4.2@2933.38,2534
  Bottom Layer w10: v1(2163.68,2698.97) 2173.68,2689 2173.68,2644 2183.68,2634 2293.68,2634 2433.68,2774 2568.68,2774 v1(2598.68,2743.97)
U2_35: Q1.2 U2.35 | length 962.6
  Top Layer w10: U2.35@1949.28,2868.3 1968.68,2868.3 1968.68,3074 1988.68,3094 v1(2043.68,3093.97) ; Q1.2 2453.68,3106.37 v1(2528.68,3181.37)
  Bottom Layer w10: v1(2043.68,3093.97) 2158.68,3093.97 2453.68,3093.97 2498.68,3138.97 2528.68,3168.97 v1(2528.68,3181.37)
U2_36: R6.2 SCL.1 U2.36 U5.2 U6.13 | length 2271.4
  Top Layer w10: U6.13 1863.68,2989 1868.68,2984 1868.68,2939 1899.28,2908.4 U2.36@1899.28,2868.3 ; U2.36@1899.25,2868.3 1899.25,2793.4 v1(1903.68,2788.97) 1923.68,2768.97 1923.68,2703.97 1963.68,2663.97 v1(2068.68,2663.97) ; v1(2108.68,2993.97) 2108.68,3053.97 2118.68,3063.97 2223.68,3063.97 2244.55,3063.97 U5.2 ; v1(2703.68,2968.97) 2708.68,2973.97 R6.2
  Bottom Layer w10: v1(1903.68,2788.97) 2073.68,2789 2073.68,2944 2108.68,2979 v1(2108.68,2993.97) ; v1(2068.68,2663.97) 2118.68,2714 2118.68,2734 2183.68,2734 2263.68,2814 2423.68,2814 2428.68,2819 2513.68,2819 2538.68,2844 2608.68,2844 2703.68,2939 v1(2703.68,2968.97) ; SCL.1 2637.54,2612.82 2637.54,2872.85
U2_37: U2.37 U6.9 | length 248.4
  Top Layer w10: U6.9 1788.52,3053.81 1773.68,3038.97 1773.68,3003.97 1803.68,2973.97 1803.68,2963.97 1849.25,2918.4 U2.37@1849.25,2868.3
USB1_A4B9: D2.2 USB1.A4B9 | length 240.6
  Top Layer w10: v1(2223.68,3459.6) 2224.05,3459.23 D2.2
  Bottom Layer w10: v1(2113.17,3522.9) 2113.17,3500.11 2153.68,3459.6 v1(2223.68,3459.6)
USB1_A5: R2.2 USB1.A5 | length 518.2
  Top Layer w10: USB1.A5 2067.88,3479.8 2093.68,3454 2138.68,3454 v1(2173.68,3488.97) ; v1(2393.68,3548.97) 2404.02,3559.31 R2.2
  Bottom Layer w10: v1(2173.68,3488.97) 2333.68,3488.97 v1(2393.68,3548.97)
USB1_A6: U1.1 USB1.A6 USB1.B6 | length 732
  Top Layer w10: v1(1943.68,3314.6) 1974.31,3283.97 U1.1 ; v1(1973.68,3483.97) 1983.68,3483.97 1989.15,3489.44 USB1.B6 ; USB1.B6 1989.18,3580.73 1976.92,3580.73 1958.68,3598.97 1958.68,3628.97 1973.68,3643.97 2038.68,3643.97 2048.68,3633.97 2048.68,3583.97 2030.58,3583.97 2028.48,3581.87 USB1.A6
  Bottom Layer w10: v1(1943.68,3314.6) 1943.68,3364 1968.68,3389 2003.68,3389 2023.68,3409 2023.68,3439 1983.68,3439 1964.38,3458.3 1973.68,3467.6 v1(1973.68,3483.97)
USB1_B4A9: D1.2 USB1.B4A9 | length 627.2
  Top Layer w10: v1(1873.68,3379.6) 1924.05,3329.23 D1.2
  Bottom Layer w10: v1(1873.68,3379.6) 1869.87,3432.53 1924.19,3486.85 v1(1924.19,3522.9)
USB1_B5: R3.2 USB1.B5 | length 214.2
  Top Layer w10: v1(1923.68,3383.97) 1933.68,3393.97 R3.2 ; v1(1943.68,3468.97) 1943.68,3516.8 USB1.B5
  Bottom Layer w10: v1(1923.68,3383.97) 1943.68,3403.97 v1(1943.68,3468.97)
USB1_B7: U1.2 USB1.A7 USB1.B7 | length 641.3
  Top Layer w10: U1.2 1908.98,3264.3 1839.78,3333.5 1839.78,3385.7 1893.68,3439.6 2009.28,3439.6 2033.68,3438.97 v1@2043.68,3449 ; USB1.A7@2008.88,3522.9 2008.68,3493.97 2018.68,3483.97 2048.18,3484.17 ; v1@2043.68,3448.97 v1(2048.18,3458.5) USB1.B7
  Bottom Layer w10: v1(2008.68,3463.97) 2042.71,3463.97 v1(2048.18,3458.5)
VBUS: C3.1 C5.1 D1.1 D2.1 U1.7 U4.3 U7.1 | length 1790.6
  Top Layer w10: U1.7 2147.69,3223.97 v1(2413.68,3223.97) ; U7.1 2628.68,3564.31 2628.68,3478.97 2609.68,3459.97 D2.1 D1.1 2573.31,3329.97 v1(2578.68,3324.6) 2581.78,3321.5 2937.08,3321.5 ; U4.3 2937.08,3321.53 ; 2937.08,3322.7 2938.25,3321.53 C5.1 C3.1
  Bottom Layer w10: v1(2413.68,3223.97) 2543.05,3223.97 2578.68,3259.6 v1(2578.68,3324.6)
pads on no net: U1.4 U1.5 U1.6 U2.14 U2.17 U2.18 U2.19 U2.20 U2.21 U2.22 U2.23 U2.24 U2.29 U2.32 U5.7 U6.10 U6.11 USB1.A8 USB1.B8

## Other copper
Top Layer:
  text "Made by Jim" at 2803.68,3573.97 h80
  text "67" at 3108.68,3403.97 h80
Bottom Layer:
  text "Made by Jim" at 3508.68,3573.97 h80
  text "67" at 3228.68,3408.97 h80